# Altium PCB semubot_lidar_driver.PcbDoc (part 1 of 2)
Units mm, origin at the board's own origin, x right, y up, seen from the top; angles counter-clockwise.
Board outline 115 x 110 mm, 4 copper layers (Top Layer, Inner 1, Inner 2, Bottom Layer), stack 1.564 mm thick; 114 components, 69 nets, 444 pads, 478 vias.
Unrouted connection lines stored in the file: 2.
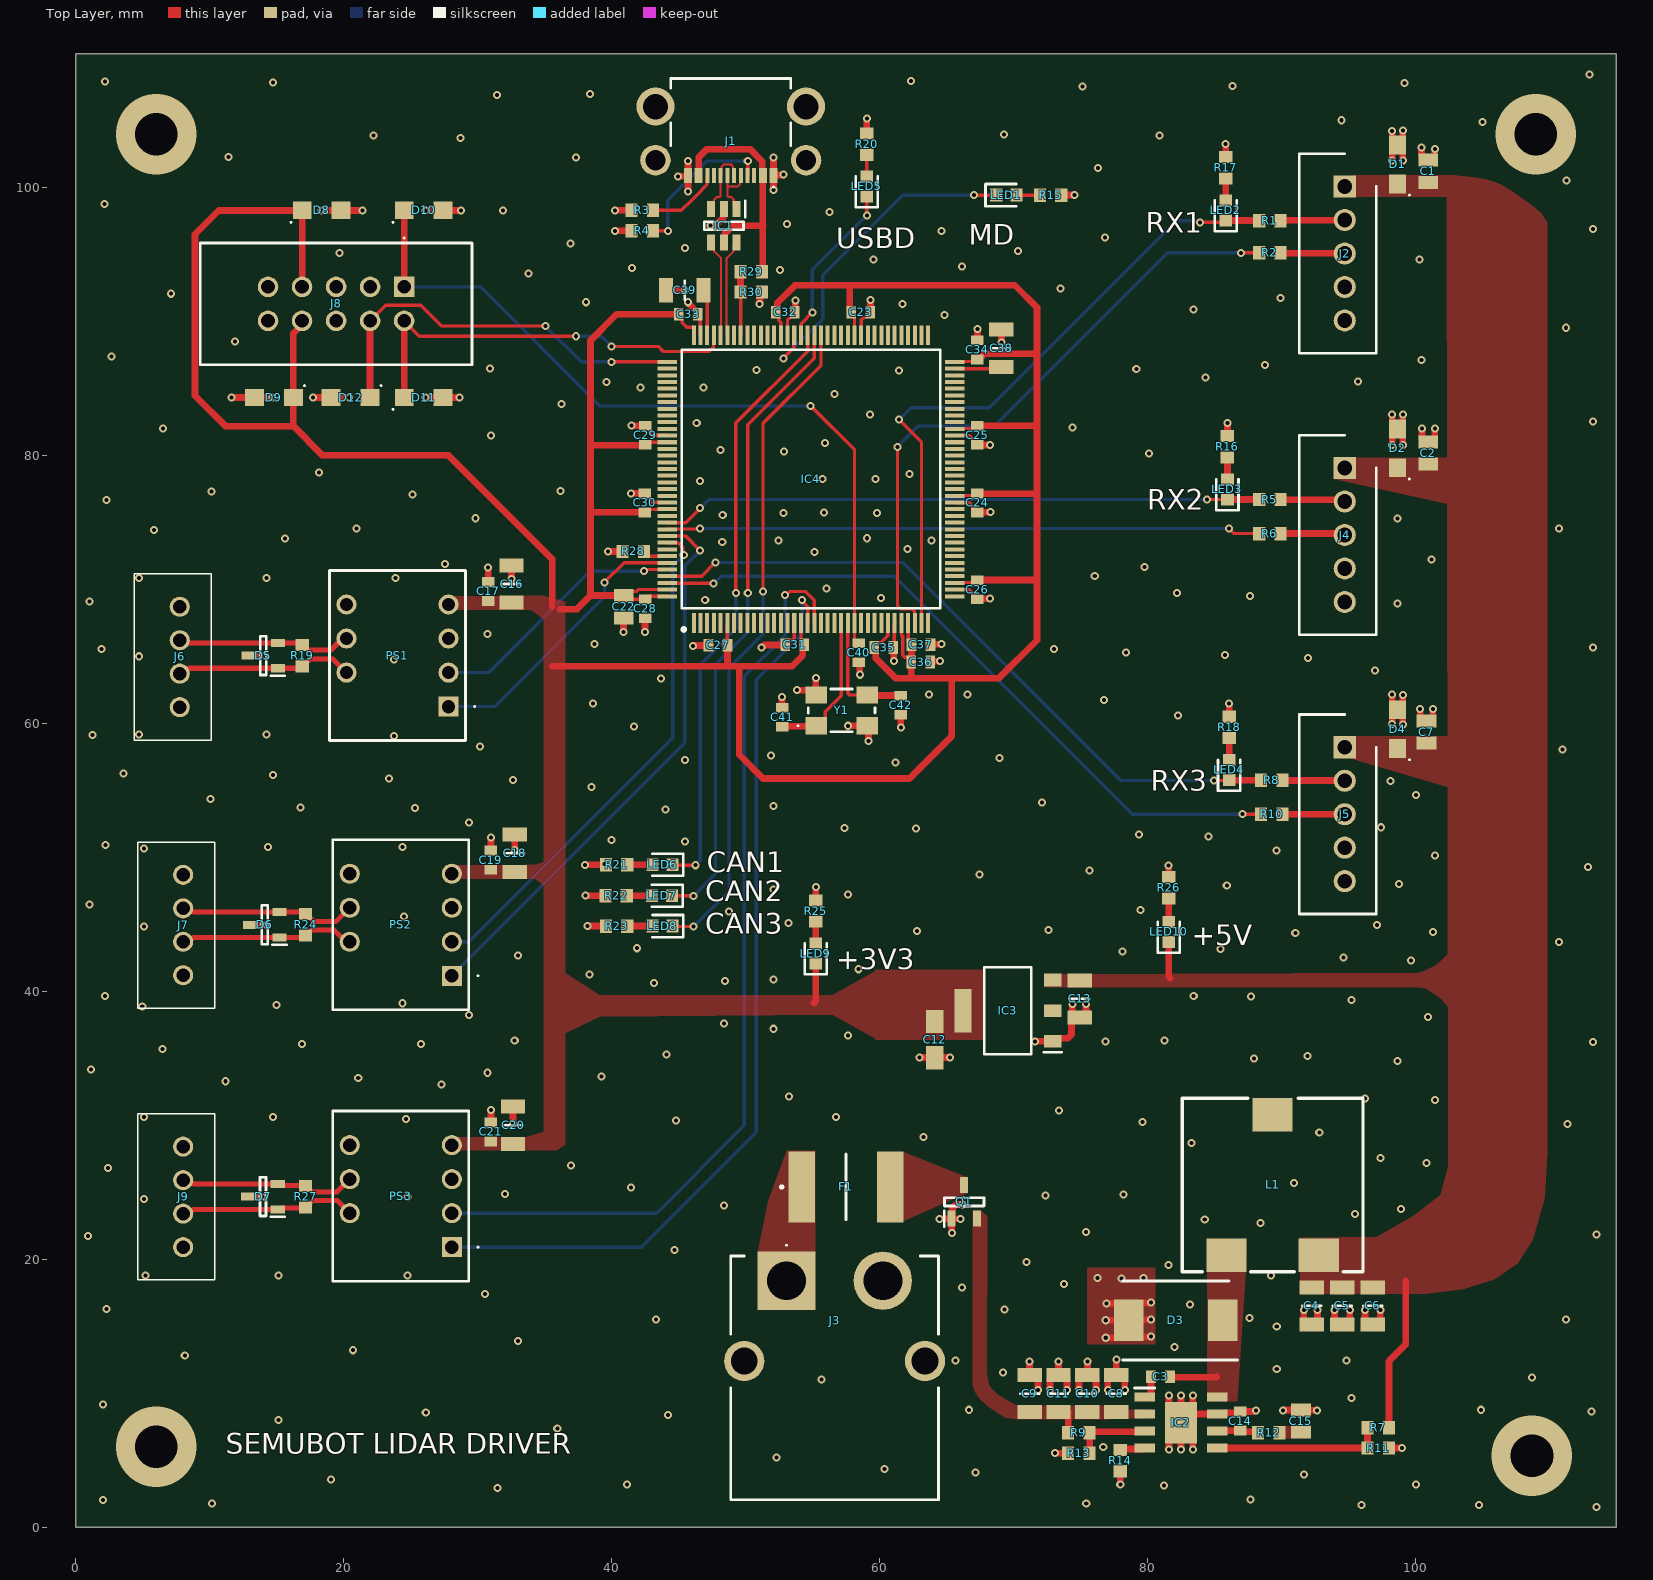
[diagram p0: Top Layer view]
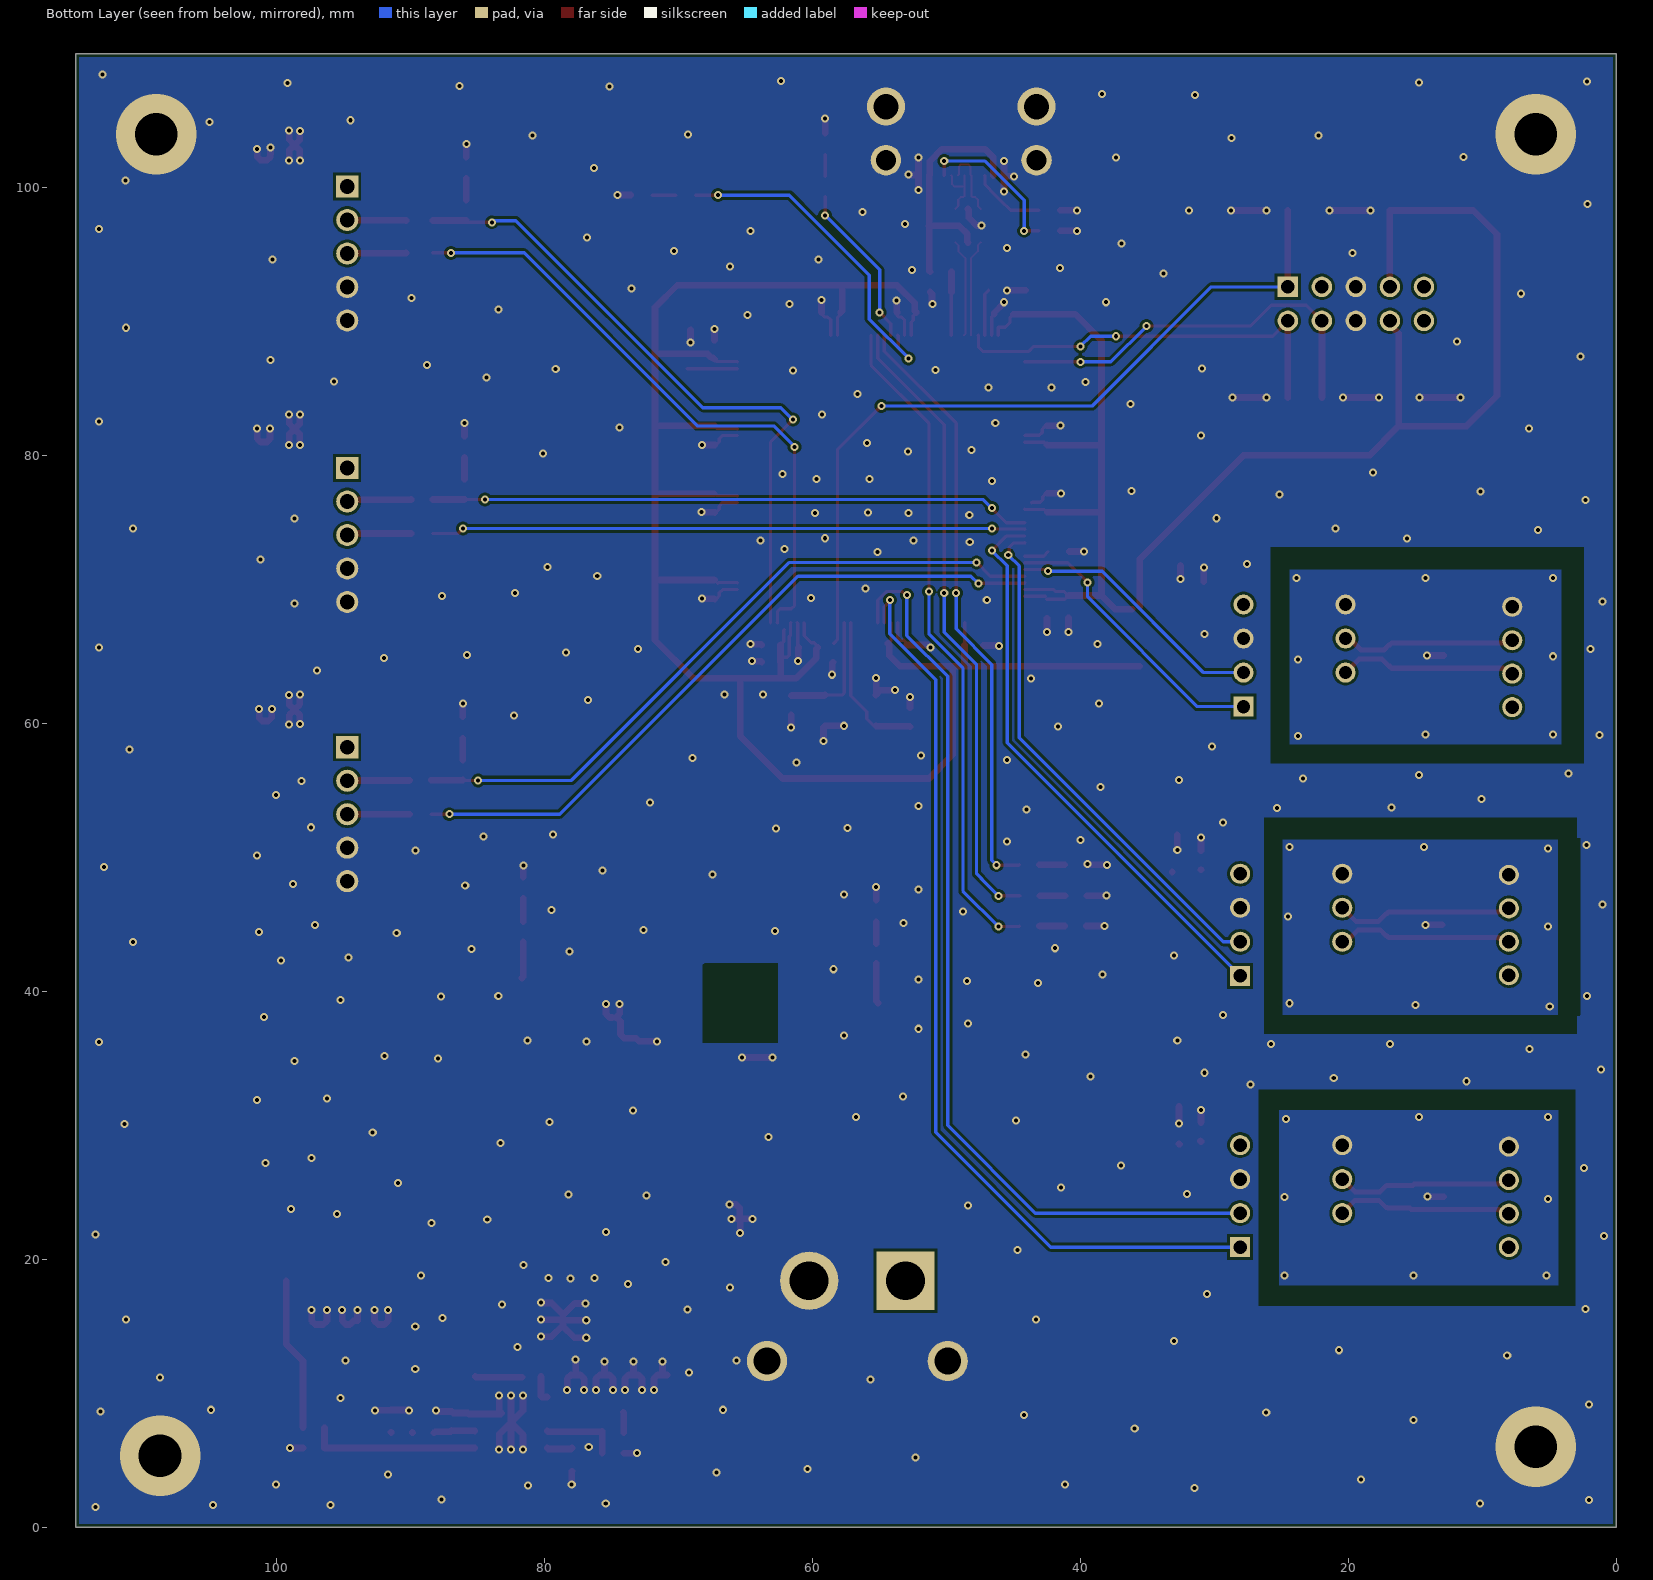
[diagram p1: Bottom Layer view, seen from below]
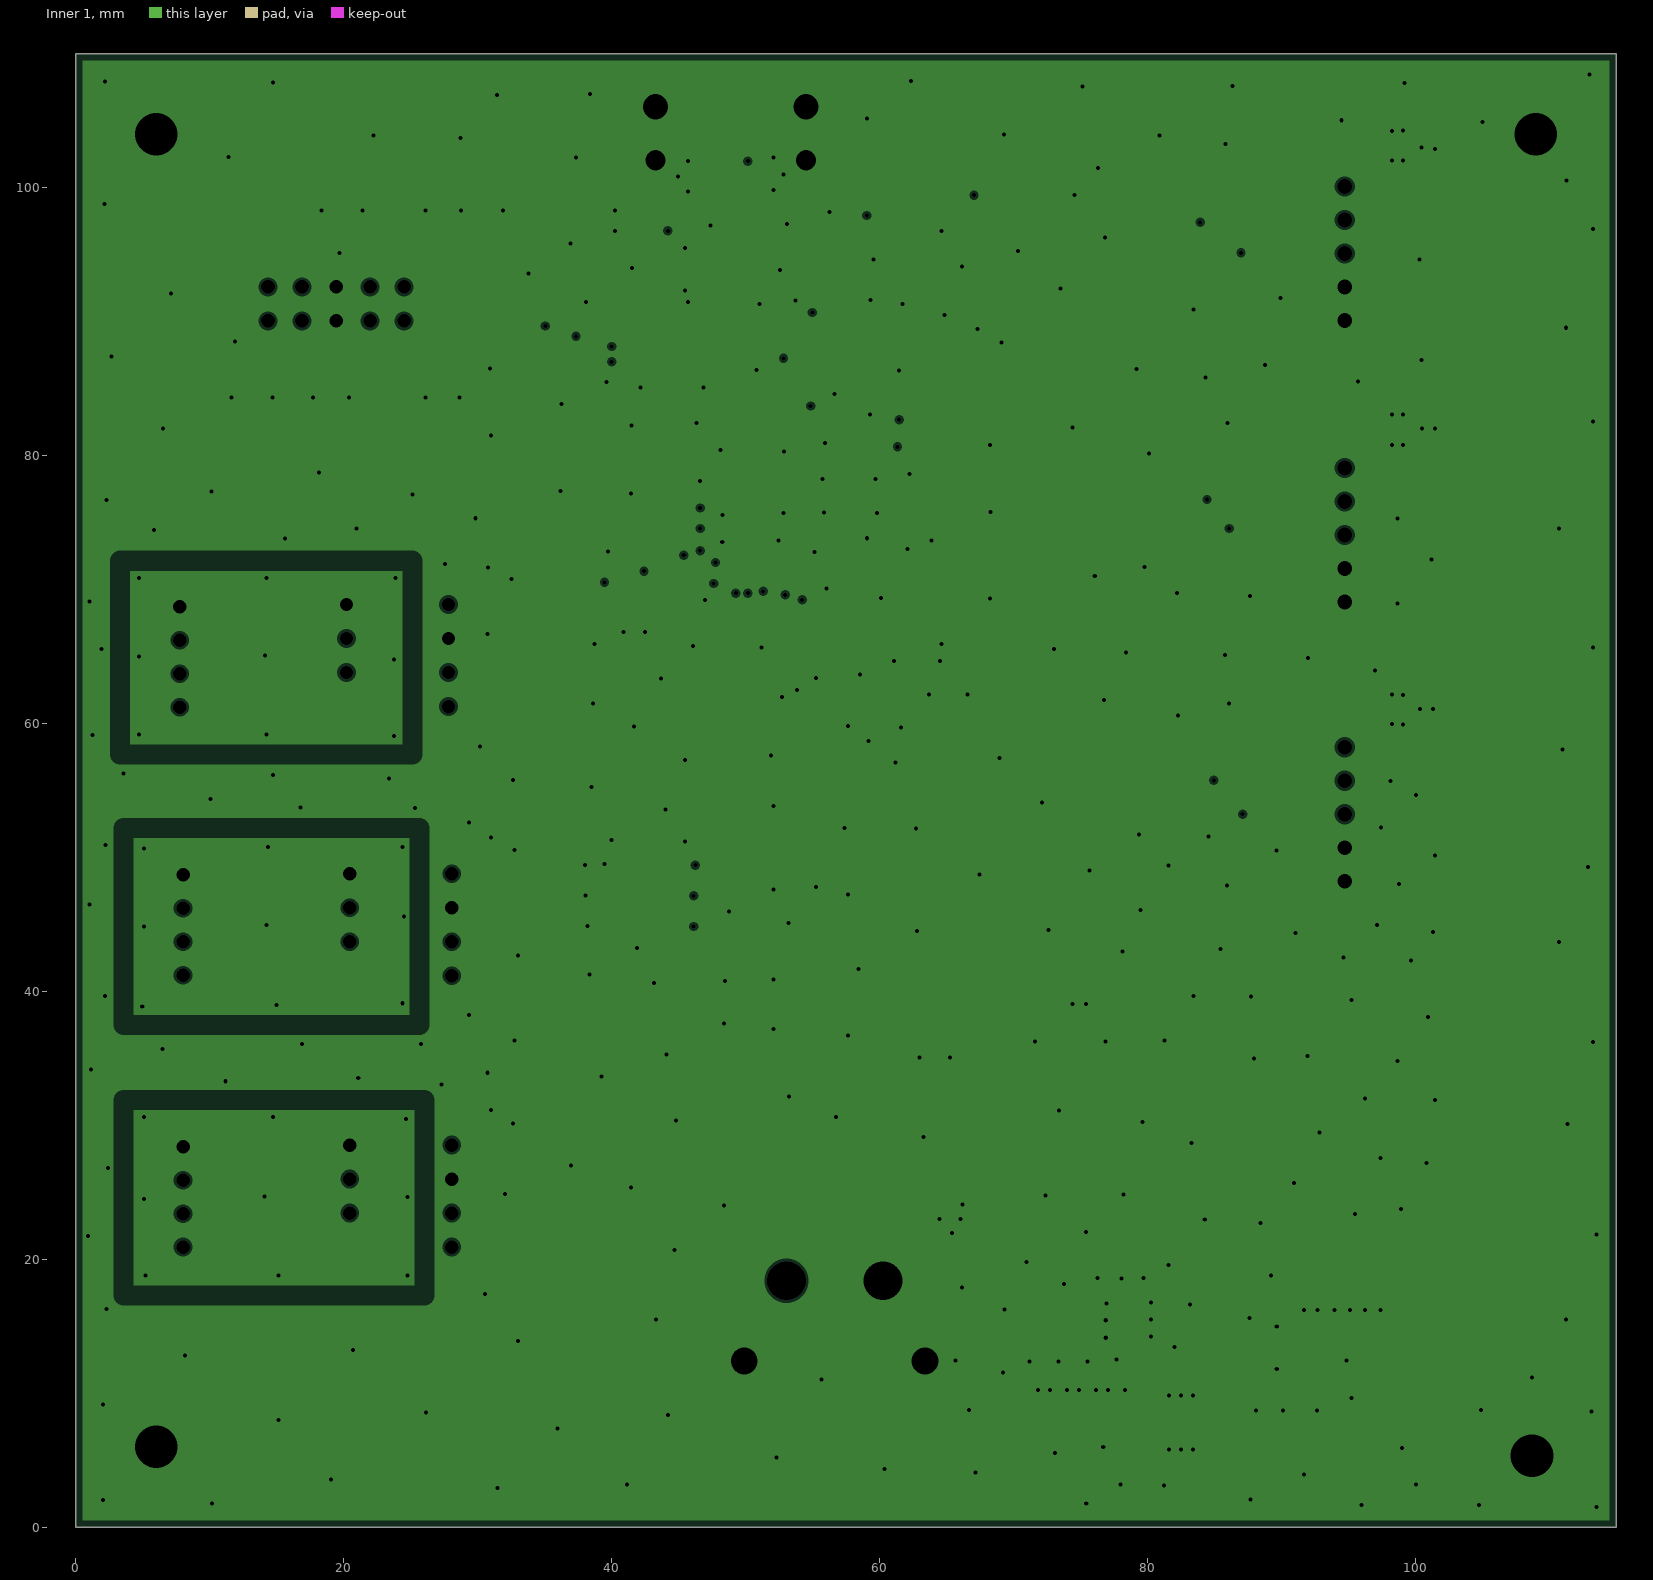
[diagram p2: Inner 1, clearances drawn from the general rule]
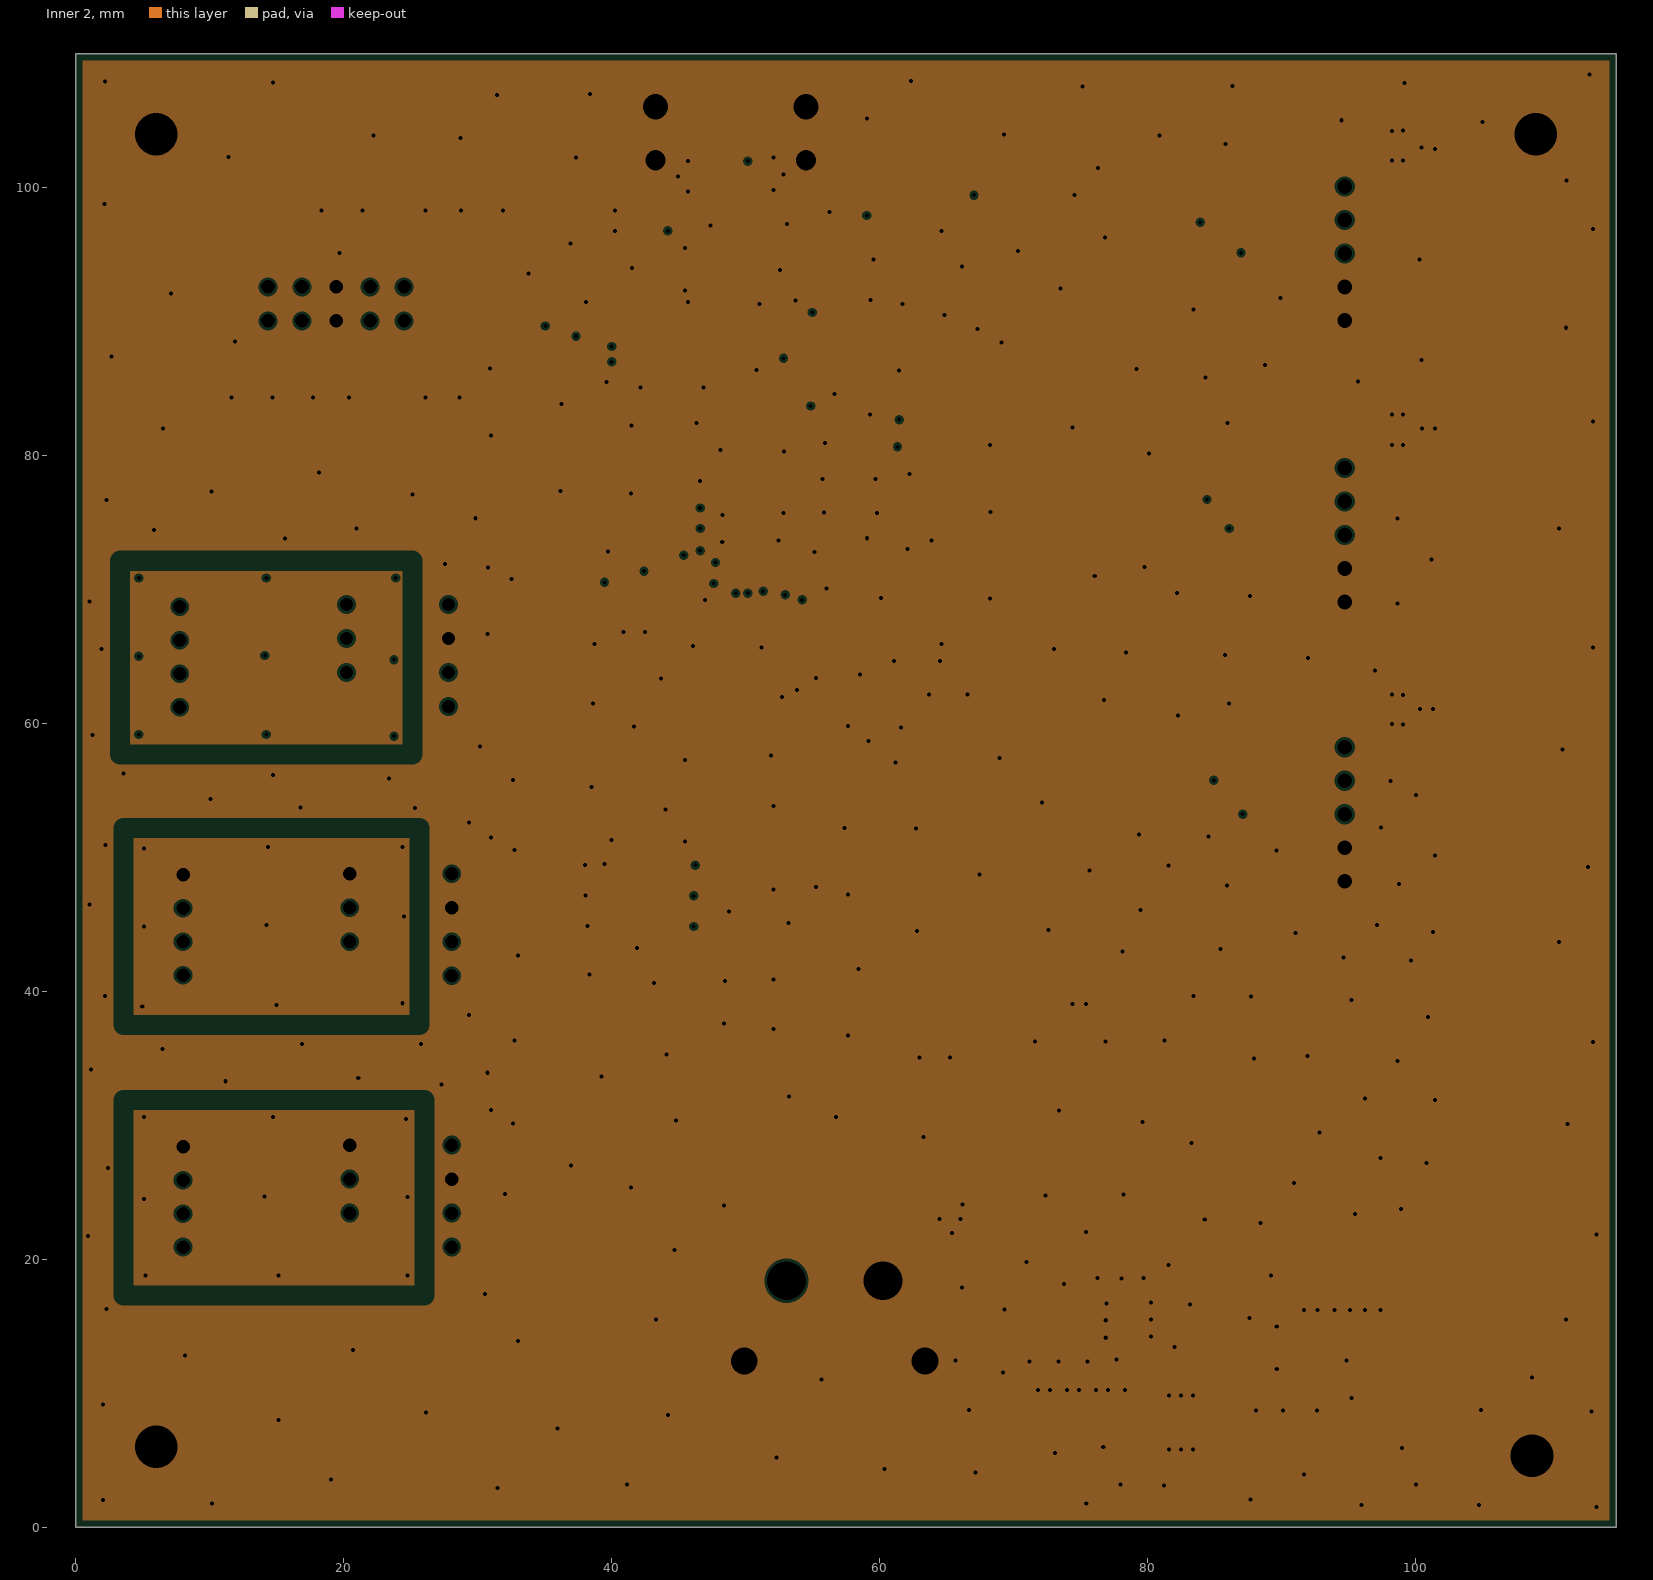
[diagram p3: Inner 2, clearances drawn from the general rule]
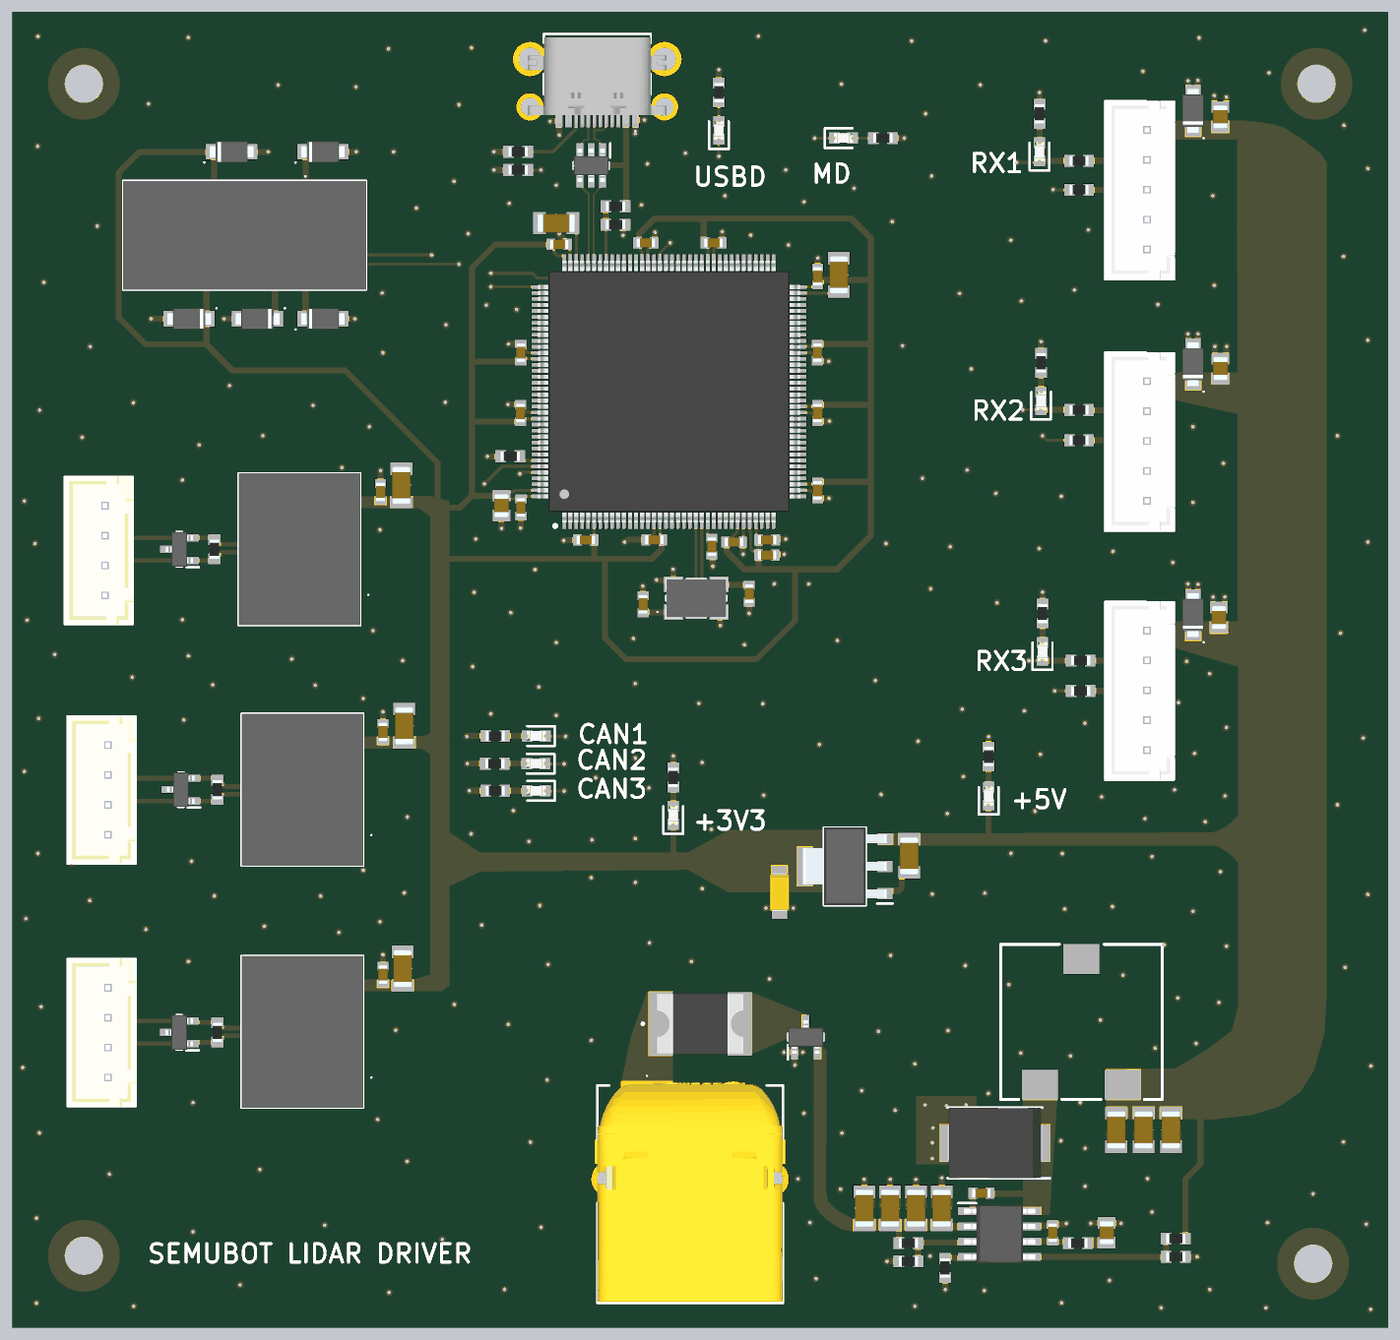
[diagram p5: 3D render of the assembled board from above, using the file's embedded part models]

## Layer stack, top to bottom
Top Solder: solder mask 0.0305, Solder Resist, Dk 3.8
Top Layer: signal copper 0.035
Dielectric 2: prepreg 0.0994, PP-006, Dk 4.1
Inner 1: plane copper 0.0152, net (Multiple Nets)
Dielectric 1: core 1.265, FR-4, Dk 4.43
Inner 2: plane copper 0.0152, net (Multiple Nets)
Dielectric 3: prepreg 0.0994, PP-006, Dk 4.1
Bottom Layer: signal copper 0.035
Bottom Solder: solder mask 0.0305, Solder Resist, Dk 3.8

## Board outline
0,0 0,110 115,110 115,0

## Design rules (kind name [scope] priority, off if disabled: settings)
AcuteAngle [All] p1: minimum=6.00000000000000E+0001 checktracksonly=FALSE
BoardOutlineClearance [All] p1: gap=0.25 ignorepadtopadclearanceinfootprint=FALSE
Clearance [All] p1: gap=0.2 ignorepadtopadclearanceinfootprint=FALSE except(0.28: Track-THPad)
DiffPairsRouting CAN1 [InNet('CANH1') OR InNet('CANL1')] p1: maxlimit=0.254 minlimit=0.254 mostfreqgap=0.254 toplayer_minwidth=0.381 toplayer_maxwidth=0.381 toplayer_prefwidth=0.381 bottomlayer_minwidth=0.381 bottomlayer_maxwidth=0.381 bottomlayer_prefwidth=0.381 maxuncoupledlength=12.7
DiffPairsRouting DiffPairsRoutingDIFF_90 [InDifferentialPair('USB_D') Or InDifferentialPair('USB')] p2: maxlimit=0.2 minlimit=0.2 mostfreqgap=0.2 toplayer_minwidth=0.155 toplayer_maxwidth=0.155 toplayer_prefwidth=0.155 bottomlayer_minwidth=0.155 bottomlayer_maxwidth=0.155 bottomlayer_prefwidth=0.155 impedanceprofiledriven=TRUE impedanceprofileid={C4F6CC11-D19B-4D07-BB28-ABDF192AAFE7} impedanceprofilevalue=90.000000 maxuncoupledlength=12.7
DiffPairsRouting [All] p3: maxlimit=0.254 minlimit=0.254 mostfreqgap=0.254 toplayer_minwidth=0.381 toplayer_maxwidth=0.381 toplayer_prefwidth=0.381 bottomlayer_minwidth=0.381 bottomlayer_maxwidth=0.381 bottomlayer_prefwidth=0.381 maxuncoupledlength=12.7
HoleSize [All] p1: absolutevalues=TRUE maxlimit=6.3 minlimit=0.2 maxpercent=80.000 minpercent=20.000
HoleToHoleClearance [All] p1: gap=0.5 allowstackedmicrovias=TRUE
MinimumSolderMaskSliver [All] p1: minsoldermaskwidth=0.1
PlaneClearance [All] p1: clearance=0.2
PlaneConnect PlaneConnect_Vias [IsVia] p1: planeconnectstyle=Direct reliefexpansion=0.508 reliefentries=4 reliefconductorwidth=0.305 reliefairgap=0.254
PlaneConnect [All] p2: planeconnectstyle=Relief reliefexpansion=0.508 reliefentries=4 reliefconductorwidth=0.305 reliefairgap=0.254
PolygonConnect PolygonConnect_Default [All] p1: connectstyle=Direct reliefconductorwidth=0.254 reliefentries=4 polygonreliefangle="90 Angle" airgapwidth=0.254
PolygonConnect [All] p2: connectstyle=Relief reliefconductorwidth=0.254 reliefentries=4 polygonreliefangle="90 Angle" airgapwidth=0.254
PolygonConnect PolygonConnect_1 [All] p3: connectstyle=Relief reliefconductorwidth=0.254 reliefentries=4 polygonreliefangle="90 Angle" airgapwidth=0.254
RoutingVias [All] p1: holewidth=0.3 width=0.6 viastyle="Through Hole" minholewidth=0.2 minwidth=0.45 maxholewidth=0.5 maxwidth=1
SilkToSolderMaskClearance [IsPad] p1: minsilkscreentomaskgap=0.15 clearancetoexposedcopper=TRUE
SolderMaskExpansion SolderMaskExpansion_via [IsVia] p1: expansion=0.102 istentingtop=TRUE
SolderMaskExpansion [All] p2: expansion=0.05 istentingtop=FALSE
SupplyNets "Schematic Supply Nets_9" [InNet('CANG2')] p1: voltage=0.000
SupplyNets "Schematic Supply Nets_5" [InNet('+3V3')] p2: voltage=0.000
SupplyNets "Schematic Supply Nets_4" [InNet('+5V')] p3: voltage=0.000
SupplyNets "Schematic Supply Nets_3" [InNet('+12V')] p4: voltage=0.000
SupplyNets "Schematic Supply Nets_2" [InNet('CANG1')] p5: voltage=0.000
SupplyNets "Schematic Supply Nets_1" [InNet('CANG3')] p6: voltage=0.000
SupplyNets "Schematic Supply Nets_8" [InNet('+5USB')] p7: voltage=0.000
SupplyNets "Schematic Supply Nets" [InNet('GND')] p8: voltage=0.000
Width Width_Power_12V_5V [InNet('+12V') Or InNet('+5V')] p1: maxlimit=5.08 minlimit=0.508 preferedwidth=1.524 // 5 A path: prefer polygon pours
Width Powerwidth [InNetClass('Power')] p2: maxlimit=1.5 minlimit=0.5 preferedwidth=1 minimp=50.000000 maximp=50.000000 favimp=50.000000
Width [All] p3: maxlimit=0.5 minlimit=0.15 preferedwidth=0.25 minimp=50.000000 maximp=50.000000 favimp=50.000000
23 further rules are at their usual default settings.

## Classes and differential pairs
component class U_microcontroller: C22 C23 C24 C25 C26 C27 C28 C29 C30 C31 C32 C33 C34 C35 C36 C37 C38 C39 C40 C41 C42 IC4 R28 R29 R30 Y1
differential pair class DIFF_90: USB_D
component class semubot_lidar_driver: 2 C2 C3 C4 C5 C6 C7 C8 C9 C10 C11 C12 C13 C14 C15 C16 C17 C18 C19 C20 C21 D1 D2 D3 D4 D5 D6 D7 D8 D9 D10 D11 D12 F1 IC1 IC2 IC3 J1 J2 J3 J4 J5 J6 J8 J9 L1 LED1 LED2 LED3 LED4 LED5 LED6 LED7 LED8 LED9 LED10 PS1 PS2 PS3 Q1 R1 R2 R3 R4 R5 R6 R7 R8 R9 R10 R11 R12 R13 R14 R15 R16 R17 R18 R19 R20 R21 R22 R23 R24 R25 R26 R27
differential pair USB_D: +USB_D_P -USB_D_N

## Components (designator, comment, footprint, x,y, rotation, side; value= is the part's Value field where it differs from the comment)
C1 "22uF" 0805Capacitor 100.965,101.237 r270 top
C2 "22uF" 0805Capacitor 100.975,80.193 r270 top
C3 "100nF" 0603Capacitor 80.986,11.24 r180 top
C4 "47uF" 1206CAPACITOR 92.262,16.518 r90 top
C5 "47uF" 1206CAPACITOR 94.548,16.518 r90 top
C6 "47uF" 1206CAPACITOR 96.834,16.518 r90 top
C7 "22uF" 0805Capacitor 100.848,59.367 r270 top
C8 "2.2uF" 1206CAPACITOR 77.684,9.97 r270 top
C9 "2.2uF" 1206CAPACITOR 71.207,9.97 r270 top
C10 "2.2uF" 1206CAPACITOR 75.525,9.97 r270 top
C11 "2.2uF" 1206CAPACITOR 73.366,9.97 r270 top
C12 "22uF Tantalum cap" CAPPM3216X180N 64.123,36.403 r270 top
C13 "10uF" 1206CAPACITOR 74.958,39.44 r90 top
C14 "47pF" 0603Capacitor 86.951,7.921 r270 top
C15 "4.7nF" 0805Capacitor 91.469,7.921 r270 top
C16 "10uF" 1206CAPACITOR 32.526,70.418 r270 top
C17 "100nF" 0603Capacitor 30.785,69.868 r270 top
C18 "10uF" 1206CAPACITOR 32.766,50.31 r270 top
C19 "100nF" 0603Capacitor 30.988,49.802 r270 top
C20 "10uF" 1206CAPACITOR 32.639,30.011 r270 top
C21 "100nF" 0603Capacitor 30.988,29.503 r270 top
C22 "4.7uF" 0805Capacitor 40.894,68.725 r90 top
C23 "100nF" 0603Capacitor 58.607,90.696 r180 top
C24 "100nF" 0603Capacitor 67.31,76.472 r90 top
C25 "100nF" 0603Capacitor 67.305,81.519 r90 top
C26 "100nF" 0603Capacitor 67.31,69.995 r90 top
C27 "100nF" 0603Capacitor 47.938,65.847 r0 top
C28 "100nF" 0603Capacitor 42.512,68.579 r90 top
C29 "100nF" 0603Capacitor 42.512,81.519 r270 top
C30 "100nF" 0603Capacitor 42.475,76.477 r270 top
C31 "100nF" 0603Capacitor 53.666,65.872 r0 top
C32 "100nF" 0603Capacitor 52.959,90.696 r180 top
C33 "100nF" 0603Capacitor 45.72,90.569 r180 top
C34 "100nF" 0603Capacitor 67.31,87.902 r270 top
C35 "100nF" 0603Capacitor 60.325,65.677 r180 top
C36 "100nF" 0603Capacitor 63.089,64.595 r180 top
C37 "100nF" 0603Capacitor 63.099,65.872 r180 top
C38 "2.2uF" 1206CAPACITOR 69.088,88.022 r270 top
C39 "2.2uF" 1206CAPACITOR 45.466,92.347 r0 top
C40 "100nF" 0603Capacitor 58.466,65.292 r90 top
C41 "12pF" 0603Capacitor 52.727,60.474 r270 top
C42 "12pF" 0603Capacitor 61.595,61.359 r90 top
D1 "SMF5.0A" SMF5.0A 98.679,101.745 r270 top
D2 "SMF5.0A" SMF5.0A 98.679,80.544 r270 top
D3 "B540CQ-13-F" B540CQ-13-F 82.129,15.431 r180 top
D4 "SMF5.0A" SMF5.0A 98.679,59.581 r270 top
D5 "PESD1CAN" SOT95P230X110-3N 13.979,65.079 r180 top
D6 "PESD1CAN" SOT95P230X110-3N 14.097,44.976 r180 top
D7 "PESD1CAN" SOT95P230X110-3N 13.97,24.677 r180 top
D8 "SMF3.3" SMF3.3 18.345,98.312 r180 top
D9 "SMF3.3" SMF3.3 14.789,84.342 r0 top
D10 "SMF3.3" SMF3.3 25.965,98.312 r180 top
D11 "SMF3.3" SMF3.3 25.965,84.342 r180 top
D12 "SMF3.3" SMF3.3 20.504,84.342 r0 top
F1 "2920L400_15MR" 2920L07560MR 57.5,25.399 r0 top
IC1 "USBLC6-2SC6" USBLC6-2SC6 48.387,97.173 r270 top
IC2 "TPS54560DDAR" TPS54560DDAR 82.51,7.811 r0 top
IC3 "AMS1117-3.3" AMS1117-3.3 69.584,38.562 r180 top
IC4 "STM32H723ZET6" STM32H723ZET6 54.886,78.254 r90 top
J1 "2169900002" 2169900002 48.895,104.92 r180 top
J2 "B5B-XH-A_LF_SN" B5B-XH-A(LF)(SN) 94.742,100.094 r90 top
J3 "XT60PW-M" XT60PW-M 53.05,18.399 r0 top
J4 "B5B-XH-A_LF_SN" B5B-XH-A(LF)(SN) 94.742,79.077 r90 top
J5 "B5B-XH-A_LF_SN" B5B-XH-A(LF)(SN) 94.742,58.231 r90 top
J6 "B4B-XH-A_LF__SN_" B4BXHALFSN 7.756,61.222 r90 top
J7 "B4B-XH-A_LF__SN_" B4BXHALFSN 8.001,41.206 r90 top
J8 "DS1013-10SSIB1" DS101310SSIB1 24.507,92.605 r180 top
J9 "B4B-XH-A_LF__SN_" B4BXHALFSN 8.001,20.908 r90 top
L1 "XRCEP125-7R2M" XRCEP125-7R2M 89.4,25.599 r0 top
LED1 "KT-0603R" LEDC1608X70N 69.469,99.459 r0 top
LED2 "KT-0603R" LEDC1608X70N 85.852,98.316 r90 top (schematic designator LED3)
LED3 "KT-0603R" LEDC1608X70N 85.979,77.488 r90 top (schematic designator LED2)
LED4 "KT-0603R" LEDC1608X70N 86.106,56.533 r90 top
LED5 "KT-0603R" LEDC1608X70N 59.055,100.106 r90 top
LED6 "KT-0603R" LEDC1608X70N 43.796,49.462 r180 top
LED7 "KT-0603R" LEDC1608X70N 43.759,47.148 r180 top
LED8 "KT-0603R" LEDC1608X70N 43.796,44.88 r180 top
LED9 "KT-0603R" LEDC1608X70N 55.245,42.829 r90 top
LED10 "KT-0603R" LEDC1608X70N 81.597,44.442 r90 top
PS1 "TD301MCANFD" TD301MCANFD 27.822,61.269 r90 top
PS2 "TD301MCANFD" TD301MCANFD 28.067,41.166 r90 top
PS3 "TD301MCANFD" TD301MCANFD 28.067,20.908 r90 top
Q1 "AO3407A" SOT95P280X125-3N 66.324,24.283 r90 top
R1 "100" 0603Resistor 89.154,97.554 r0 top
R2 "100" 0603Resistor 89.154,95.141 r0 top
R3 "5.1k" 0603Resistor 42.291,98.316 r0 top
R4 "5.1k" 0603Resistor 42.291,96.792 r0 top
R5 "100" 0603Resistor 89.154,76.726 r0 top
R6 "100" 0603Resistor 89.154,74.186 r0 top
R7 "54.9k" 0603Resistor 97.242,7.43 r0 top
R8 "100" 0603Resistor 89.281,55.771 r0 top
R9 "442k" 0603Resistor 74.89,7.049 r180 top
R10 "100" 0603Resistor 89.281,53.231 r0 top
R11 "10.2k" 0603Resistor 97.242,5.906 r180 top
R12 "16.9k" 0603Resistor 89.058,7.049 r180 top
R13 "90.9k" 0603Resistor 74.89,5.525 r0 top
R14 "243k" 0603Resistor 77.963,4.971 r90 top
R15 "1k" 0603Resistor 72.771,99.459 r0 top
R16 "1k" 0603Resistor 85.979,80.663 r90 top
R17 "1k" 0603Resistor 85.852,101.491 r90 top
R18 "1k" 0603Resistor 86.106,59.708 r90 top
R19 "120" 0603Resistor 16.9,65.079 r270 top
R20 "1k" 0603Resistor 59.055,103.269 r90 top
R21 "1k" 0603Resistor 40.367,49.462 r180 top
R22 "1k" 0603Resistor 40.33,47.148 r180 top
R23 "1k" 0603Resistor 40.367,44.88 r180 top
R24 "120" 0603Resistor 17.145,44.976 r270 top
R25 "1k" 0603Resistor 55.245,46.004 r90 top
R26 "1.5k" 0603Resistor 81.597,47.744 r90 top
R27 "120" 0603Resistor 17.145,24.677 r270 top
R28 "10k" 0603Resistor 41.62,72.847 r0 top
R29 "22k" 0603Resistor 50.419,93.744 r180 top
R30 "33k" 0603Resistor 50.419,92.22 r180 top
Y1 "XC53M4-8.000-F10NJDTD" XC53M48000F10NJDTD 57.172,60.982 r0 top

## Footprints (in the part's own frame and the unit in brackets; to place one, negate y for a bottom-side part, rotate by r counter-clockwise, add the part's x,y. Pads: shape width x height; smd on the part's side, far side on the other; paste and mask are expansions set on the pad)
0603Capacitor [mm]
  rect 0.73x0.94 smd: 1(-0.71,0) 2(0.71,0)
  body extent -0.8,-0.4 0.8,0.4, height 0.9
0603Resistor [mm]
  rect 0.9x1 smd: 1(-0.8,0) 2(0.8,0)
  body extent -0.8,-0.4 0.8,0.4, height 0.55
0805Capacitor [mm]
  rect 0.97x1.47 smd: 1(-0.83,0) 2(0.83,0)
  body extent -1,-0.63 1,0.63, height 1.45
1206CAPACITOR [mm]
  rect 1.05x1.82 smd: 1(-1.39,0) 2(1.39,0)
  silkscreen extent 0,-0.7 0,0.7, body extent -1.6,-0.8 1.6,0.8, height 1.8
2920L07560MR [mm]
  rect 2x5.3 smd: 1(-3.3,0) 2(3.3,0)
  silkscreen extent -4.9,-2.46 0,2.46, body extent -3.68,-2.56 3.68,2.56, height 1.19
2169900002 [mm]
  rect 0.6x1.1 smd: A1(-3.2,4) A4(-2.4,4) A9(2.4,4) A12(3.2,4)
  rect 0.3x1.1 smd: A5(-1.25,4) A6(-0.25,4) A7(0.25,4) A8(1.25,4) B5(1.75,4) B6(0.75,4) B7(-0.75,4) B8(-1.75,4)
  round 2.28 hole 1.52: MH1(-5.62,2.85) MH4(5.62,2.85)
  round 2.85 hole 1.9: MH2(-5.62,-1.15) MH3(5.62,-1.15)
  silkscreen extent -4.47,-3.25 4.47,4.9, body extent -5.77,-2.95 5.77,4.25, height 2.5
AMS1117-3.3 [mm] "C6186"
  rect 1.3x0.95 smd: 1(-3.35,2.29) 2(-3.35,0) 3(-3.35,-2.29)
  rect 1.3x3.25 smd: 4(3.35,0)
  silkscreen extent -4,-3.25 1.75,3.25, body extent -3.5,-3.25 3.5,3.25, height 1.8
B4BXHALFSN [mm]
  round 1.5 hole 1: 1(0,0) 2(2.5,0) 3(5,0) 4(7.5,0)
  silkscreen extent -2.45,-2.35 9.95,3.4, body extent -2.45,-2.35 9.95,3.4, height 7.52
B5B-XH-A(LF)(SN) [mm]
  rect 1.65x1.65 hole 1.1: 1(0,0)
  round 1.65 hole 1.1: 2(-2.5,0) 3(-5,0) 4(-7.5,0) 5(-10,0)
  silkscreen extent -12.45,-2.35 2.45,3.4, body extent -12.4,-2.45 2.5,3.3, height 7
B540CQ-13-F [mm]
  rect 2.2x3.1 smd: 1(-3.5,0) 2(3.5,0)
  silkscreen extent -4.6,-2.95 3.97,2.95, body extent -3.97,-2.95 3.97,2.95, height 2.5
CAPPM3216X180N [mm]
  rect 1.75x1.3 smd: 1(-1.35,0) 2(1.35,0)
  body extent -1.6,-0.8 1.6,0.8, height 1.8
DS101310SSIB1 [mm]
  rect 1.53x1.53 hole 1.02: 1(0,0)
  round 1.53 hole 1.02: 2(0,2.54) 3(2.54,0) 4(2.54,2.54) 5(5.08,0) 6(5.08,2.54) 7(7.62,0) 8(7.62,2.54) 9(10.16,0) 10(10.16,2.54)
  silkscreen extent -5.07,-3.7 15.23,5.82, body extent -5.07,-3.28 15.23,5.82, height 9.65
LEDC1608X70N [mm]
  rect 0.9x0.95 smd: 1(-0.75,0) 2(0.75,0)
  silkscreen extent -1.55,-0.82 0.75,0.82, body extent -0.8,-0.4 0.8,0.4, height 0.65
SMF3.3 [mm] "TVS DIODE 3V3"
  rect 1.4x1.3 smd: 1(-1.45,0) 2(1.45,0)
  silkscreen extent 2.24,0.84 2.34,0.94, body extent -1.83,-0.87 1.83,0.87, height 1.1
SMF5.0A [mm]
  rect 1.4x1.3 smd: 1(-1.45,0) 2(1.45,0)
  silkscreen extent 2.24,0.84 2.34,0.94, body extent -1.83,-0.87 1.83,0.87, height 1.1
SOT95P230X110-3N [mm]
  rect 1.05x0.6 smd: 1(-1.1,0.95) 2(-1.1,-0.95) 3(1.1,0)
  silkscreen extent -1.63,-1.45 0.23,1.5, body extent -1.15,-1.45 1.15,1.45, height 1.1
SOT95P280X125-3N [mm]
  rect 1.2x0.6 smd: 1(-1.25,0.95) 2(-1.25,-0.95) 3(1.25,0)
  silkscreen extent -1.85,-1.48 0.3,1.5, body extent -1.4,-1.48 1.4,1.48, height 1.25
STM32H723ZET6 [mm]
  rect 1.475x0.3 smd: 1(-10.738,8.75) 2(-10.738,8.25) 3(-10.738,7.75) 4(-10.738,7.25) 5(-10.738,6.75) 6(-10.738,6.25) 7(-10.738,5.75) 8(-10.738,5.25) 9(-10.738,4.75) 10(-10.738,4.25) 11(-10.738,3.75) 12(-10.738,3.25) 13(-10.738,2.75) 14(-10.738,2.25) 15(-10.738,1.75) 16(-10.738,1.25) 17(-10.738,0.75) 18(-10.738,0.25) 19(-10.738,-0.25) 20(-10.738,-0.75) 21(-10.738,-1.25) 22(-10.738,-1.75) 23(-10.738,-2.25) 24(-10.738,-2.75) 25(-10.738,-3.25) 26(-10.738,-3.75) 27(-10.738,-4.25) 28(-10.738,-4.75) 29(-10.738,-5.25) 30(-10.738,-5.75) 31(-10.738,-6.25) 32(-10.738,-6.75) 33(-10.738,-7.25) 34(-10.738,-7.75) 35(-10.738,-8.25) 36(-10.738,-8.75) 73(10.738,-8.75) 74(10.738,-8.25) 75(10.738,-7.75) 76(10.738,-7.25) 77(10.738,-6.75) 78(10.738,-6.25) 79(10.738,-5.75) 80(10.738,-5.25) 81(10.738,-4.75) 82(10.738,-4.25) 83(10.738,-3.75) 84(10.738,-3.25) 85(10.738,-2.75) 86(10.738,-2.25) 87(10.738,-1.75) 88(10.738,-1.25) 89(10.738,-0.75) 90(10.738,-0.25) 91(10.738,0.25) 92(10.738,0.75) 93(10.738,1.25) 94(10.738,1.75) 95(10.738,2.25) 96(10.738,2.75) 97(10.738,3.25) 98(10.738,3.75) 99(10.738,4.25) 100(10.738,4.75) 101(10.738,5.25) 102(10.738,5.75) 103(10.738,6.25) 104(10.738,6.75) 105(10.738,7.25) 106(10.738,7.75) 107(10.738,8.25) 108(10.738,8.75)
  rect 0.3x1.475 smd: 37(-8.75,-10.738) 38(-8.25,-10.738) 39(-7.75,-10.738) 40(-7.25,-10.738) 41(-6.75,-10.738) 42(-6.25,-10.738) 43(-5.75,-10.738) 44(-5.25,-10.738) 45(-4.75,-10.738) 46(-4.25,-10.738) 47(-3.75,-10.738) 48(-3.25,-10.738) 49(-2.75,-10.738) 50(-2.25,-10.738) 51(-1.75,-10.738) 52(-1.25,-10.738) 53(-0.75,-10.738) 54(-0.25,-10.738) 55(0.25,-10.738) 56(0.75,-10.738) 57(1.25,-10.738) 58(1.75,-10.738) 59(2.25,-10.738) 60(2.75,-10.738) 61(3.25,-10.738) 62(3.75,-10.738) 63(4.25,-10.738) 64(4.75,-10.738) 65(5.25,-10.738) 66(5.75,-10.738) 67(6.25,-10.738) 68(6.75,-10.738) 69(7.25,-10.738) 70(7.75,-10.738) 71(8.25,-10.738) 72(8.75,-10.738) 109(8.75,10.738) 110(8.25,10.738) 111(7.75,10.738) 112(7.25,10.738) 113(6.75,10.738) 114(6.25,10.738) 115(5.75,10.738) 116(5.25,10.738) 117(4.75,10.738) 118(4.25,10.738) 119(3.75,10.738) 120(3.25,10.738) 121(2.75,10.738) 122(2.25,10.738) 123(1.75,10.738) 124(1.25,10.738) 125(0.75,10.738) 126(0.25,10.738) 127(-0.25,10.738) 128(-0.75,10.738) 129(-1.25,10.738) 130(-1.75,10.738) 131(-2.25,10.738) 132(-2.75,10.738) 133(-3.25,10.738) 134(-3.75,10.738) 135(-4.25,10.738) 136(-4.75,10.738) 137(-5.25,10.738) 138(-5.75,10.738) 139(-6.25,10.738) 140(-6.75,10.738) 141(-7.25,10.738) 142(-7.75,10.738) 143(-8.25,10.738) 144(-8.75,10.738)
  silkscreen extent -11.35,-9.65 9.65,9.65, body extent -10.95,-10.95 10.95,10.95, height 1.6
TD301MCANFD [mm]
  rect 1.5x1.5 hole 1: 1(0,0)
  round 1.5 hole 1: 2(2.54,0) 3(5.08,0) 4(7.62,0) 5(7.62,7.62) 6(5.08,7.62) 7(2.54,7.62)
  silkscreen extent -2.54,-2 10.16,8.89, body extent -2.54,-1.27 10.16,8.89, height 8.55
TPS54560DDAR [mm]
  rect 1.525x0.65 smd: 1(-2.712,1.905) 2(-2.712,0.635) 3(-2.712,-0.635) 4(-2.712,-1.905) 5(2.712,-1.905) 6(2.712,-0.635) 7(2.712,0.635) 8(2.712,1.905)
  rect 2.4x3.1 smd: 9(0,0)
  silkscreen extent -3.47,2.58 -1.95,2.58, body extent -3,-2.45 3,2.45, height 1.57
USBLC6-2SC6 [mm]
  rect 1.2x0.6 smd: 1(-1.25,0.95) 2(-1.25,0) 3(-1.25,-0.95) 4(1.25,-0.95) 5(1.25,0) 6(1.25,0.95)
  silkscreen extent -1.85,-1.46 0.3,1.6, body extent -1.4,-1.46 1.4,1.46, height 1.45
XC53M48000F10NJDTD [mm]
  rect 1.6x1.3 smd: 1(-1.9,-1.15) 2(1.9,-1.15) 3(1.9,1.15) 4(-1.9,1.15)
  silkscreen extent -3.3,-1.6 2.5,1.6, body extent -2.57,-1.67 2.57,1.67, height 0.9
XRCEP125-7R2M [mm]
  rect 3x2.5 smd: 1(-3.498,-5.294) 2(3.402,-5.294) 3(-0.048,5.206)
  silkscreen extent -6.8,-6.53 6.7,6.44
XT60PW-M [mm]
  rect 4.35x4.35 hole 2.9: 1(0,0)
  round 4.35 hole 2.9: 2(7.2,0)
  round 3 hole 2: MH1(-3.15,-6) MH2(10.35,-6)
  silkscreen extent -4.15,-16.35 11.35,2.7, body extent -4.35,-16.23 11.55,2.05, height 8.45

## Part data
C1 C2 C3 C4 C5 C6 C7 C8 C9 C10 C11 C13 C14 C15 C16 C17 C18 C19 C20 C21 C22 C23 C24 C25 C26 C27 C28 C29 C30 C31 C32 C33 C34 C35 C36 C37 C38 C39 C40 C41 C42: library part Capacitor, "Capacitor"
  C1 C2 C7: Capacitance=22uF
  C3 C17 C19 C21 C23 C24 C25 C26 C27 C28 C29 C30 C31 C32 C33 C34 C35 C36 C37 C40: Capacitance=100nF
  C4 C5 C6: Capacitance=47uF
  C8 C9 C10 C11 C38 C39: Capacitance=2.2uF
  C13 C16 C18 C20: Capacitance=10uF
  C14: Capacitance=47pF
  C15: Capacitance=4.7nF
  C22: Capacitance=4.7uF
  C41 C42: Capacitance=12pF
C12: library part CA45-A010K226T, "Capacitor Polarised C122643 CA45-A010K226T", Manufacturer_Name="Hunan Xiangyee in S&T", Datasheet Link=https://datasheet.lcsc.com/szlcsc/1811261831_Hunan-Xiangyee-in-S-T-CA45-A010K226T_C122643.pdf, Height=1.8mm, Manufacturer_Part_Number=CA45-A010K226T
D1 D2 D4: "TVS diode", ComponentLink1Description=Datasheet, ComponentLink1URL=https://www.littelfuse.com/assetdocs/tvs-diodes-smf-datasheet?assetguid=7EB8A5B6-BDD0-4561-8F19-0C3CC6F9B2AF, Supplier 1=Mouser, Supplier Part Number 1=SMF5.0A
D3: "Schottky Diode", Manufacturer_Name="Diodes Incorporated", Mouser Part Number=621-B540CQ-13-F, Arrow Part Number=B540CQ-13-F, Arrow Price/Stock=https://www.arrow.com/en/products/b540cq-13-f/diodes-incorporated?utm_currency=USD&region=europe, Datasheet Link=https://www.diodes.com/assets/Datasheets/ds13012.pdf, Height=2.5mm, Manufacturer_Part_Number=B540CQ-13-F, Mouser Price/Stock=https://www.mouser.co.uk/ProductDetail/Diodes-Incorporated/B540CQ-13-F?qs=BvpHGKeVh3rbtYAYW%2FUwCw%3D%3D
D5 D6 D7: "TVS Diode (Bi-directional)", Manufacturer_Name=NXP, Mouser Part Number=N/A, Datasheet Link=https://datasheet.preprod.pas.partquest.com/images/VipMasterIC/IC/PHGL/PHGLS15341/PHGLS15341-1.pdf?hkey=61A2E4C270F0397D049F8F05BD4F1054, Height=1.1mm, Manufacturer_Part_Number=PESD1CAN, Mouser Price/Stock=https://www.mouser.co.uk/ProductDetail/NXP-Semiconductors/PESD1CAN?qs=55YtniHzbhBnD7lYYuVpRQ%3D%3D
D8 D9 D10 D11 D12: "TVS DIODE 3V3", ComponentLink1Description=Datasheet, ComponentLink1URL=https://www.littelfuse.com/assetdocs/tvs-diodes-smf3-3-datasheet?assetguid=2E80CD26-B0C3-442F-9D77-27A283CCFF4F
F1: "Resettable Fuse", Arrow Part Number=2920L400/15MR, Manufacturer_Name=LITTELFUSE, Mouser Part Number=576-2920L400/15MR, Arrow Price/Stock=https://www.arrow.com/en/products/2920l40015mr/littelfuse?utm_currency=USD&region=nac, Datasheet Link=http://m.littelfuse.com/~/media/electronics/datasheets/resettable_ptcs/littelfuse_ptc_2920l_datasheet.pdf.pdf, Height=1.8mm, Manufacturer_Part_Number=2920L400/15MR, Mouser Price/Stock=https://www.mouser.co.uk/ProductDetail/Littelfuse/2920L400-15MR?qs=%2FPOkb%252BiDxRVcBFTgv8H%2FIw%3D%3D
IC1: "Integrated Circuit", Manufacturer_Name=STMicroelectronics, Mouser Part Number=511-USBLC6-2SC6, Arrow Part Number=USBLC6-2SC6, Arrow Price/Stock=https://www.arrow.com/en/products/usblc6-2sc6/stmicroelectronics.html?utm_currency=USD&region=nac, Datasheet Link=https://www.st.com/resource/en/datasheet/usblc6-2.pdf, Height=1.45mm, Manufacturer_Part_Number=USBLC6-2SC6, Mouser Price/Stock=https://www.mouser.co.uk/ProductDetail/STMicroelectronics/USBLC6-2SC6?qs=po45yt2pPpu%2FhNIlwQdTlg%3D%3D
IC2: "Integrated Circuit", Manufacturer_Name="Texas Instruments", Mouser Part Number=595-TPS54560DDAR, Arrow Part Number=TPS54560DDAR, Arrow Price/Stock=https://www.arrow.com/en/products/tps54560ddar/texas-instruments?region=nac, Datasheet Link=http://www.ti.com/lit/ds/symlink/tps54560.pdf, Height=1.7mm, Manufacturer_Part_Number=TPS54560DDAR, Mouser Price/Stock=https://www.mouser.co.uk/ProductDetail/Texas-Instruments/TPS54560DDAR?qs=%2FA2SZCkL4Tlm1gC5t8ZNIg%3D%3D
IC3: "Integrated Circuit", Manufacturer_Name="Advanced Monolithic Systems", Manufacturer_Part_Number=AMS1117-1.5, Datasheet Link=http://www.advanced-monolithic.com/pdf/ds1117.pdf, Height=1.8mm
IC4: "Integrated Circuit", Manufacturer_Name=STMicroelectronics, Mouser Part Number=511-STM32H723ZET6, Arrow Part Number=STM32H723ZET6, Arrow Price/Stock=https://www.arrow.com/en/products/stm32h723zet6/stmicroelectronics?utm_currency=USD&region=nac, Datasheet Link=https://www.st.com/resource/en/datasheet/stm32h723zg.pdf, Height=1.6mm, Manufacturer_Part_Number=STM32H723ZET6, Mouser Price/Stock=https://www.mouser.co.uk/ProductDetail/STMicroelectronics/STM32H723ZET6?qs=sPbYRqrBIVnvdSB0MwAafg%3D%3D
J1: "Connector", Manufacturer_Name=Molex, Arrow Part Number=2169900002, Arrow Price/Stock=https://www.arrow.com/en/products/2169900002/molex.html?utm_currency=USD&region=nac, Datasheet Link=https://www.molex.com/en-us/products/part-detail-pdf/2169900002?display=pdf, Height=3.36mm, Manufacturer_Part_Number=2169900002
J2 J4 J5: "Connector", Arrow Part Number=B5B-XH-A(LF)(SN), Manufacturer_Name="JST (JAPAN SOLDERLESS TERMINALS)", Mouser Part Number=N/A, Arrow Price/Stock=https://www.arrow.com/en/products/b5b-xh-a-lf-sn/jst-manufacturing.html?utm_currency=USD&region=europe, Datasheet Link=http://www.jst-mfg.com/product/pdf/eng/eXH.pdf, Height=7mm, Manufacturer_Part_Number=B5B-XH-A(LF)(SN), Mouser Price/Stock=https://www.mouser.co.uk/ProductDetail/JST-Commercial/B5B-XH-ALFSN?qs=IKkN%2F947nfBtEhlRye3uAw%3D%3D
J3: "Connector: DC supply; socket; male; power supply; XT60; 30A; 500V", ComponentLink1Description=Datasheet, ComponentLink1URL=https://www.tme.eu/Document/b13629717d44ae038681dba08d18c0b6/XT60PW-M.pdf
J6 J7 J9: "Connector", Arrow Part Number=B4B-XH-A(LF)(SN), Manufacturer_Name="JST (JAPAN SOLDERLESS TERMINALS)", Mouser Part Number=306-B4BXHALFSN, Arrow Price/Stock=https://www.arrow.com/en/products/b4b-xh-a-lf-sn/jst-manufacturing.html?utm_currency=USD&region=europe, Datasheet Link=https://datasheet.lcsc.com/szlcsc/JST-Sales-America-B4B-XH-A-LF-SN_C144395.pdf, Height=7mm, Manufacturer_Part_Number=B4B-XH-A(LF)(SN), Mouser Price/Stock=https://www.mouser.co.uk/ProductDetail/JST-Commercial/B4B-XH-ALFSN?qs=cdbOS8ANM9CfC08d%252BywhFw%3D%3D
J8: "Connector", Manufacturer_Name=Connfly, Datasheet Link=https://www.tme.com/Document/27ec11f62a6bc702dcb7110a541f177d/DS1013.pdf, Height=9.55mm, Manufacturer_Part_Number=DS1013-10SSIB1
LED1 LED2 LED3 LED4 LED5 LED6 LED7 LED8 LED9 LED10: "LED", Manufacturer_Name="Hubei KENTO Elec", Datasheet Link=https://datasheet.lcsc.com/szlcsc/Hubei-KENTO-Elec-KT-0603R_C2286.pdf, Height=0.7mm, Manufacturer_Part_Number=KT-0603R
PS1 PS2 PS3: "Power Supply", Manufacturer_Name="Mornsun Power", Datasheet Link=https://www.mornsun-power.com/public/uploads/pdf/TD5(3)01MCANFD.pdf, Height=8.45mm, Manufacturer_Part_Number=TD301MCANFD
Q1: "MOSFET (P-Channel)", Arrow Part Number=AO3401A, Manufacturer_Name="Alpha & Omega Semiconductors", Arrow Price/Stock=https://www.arrow.com/en/products/ao3401a/alpha-and-omega-semiconductor.html?utm_currency=USD&region=nac, Height=1.25mm, Manufacturer_Part_Number=AO3407A
R1 R2 R3 R4 R5 R6 R7 R8 R9 R10 R11 R12 R13 R14 R15 R16 R17 R18 R19 R20 R21 R22 R23 R24 R25 R26 R27 R28 R29 R30: library part Resistor, "SMD Resistor"
  R1 R2 R5 R6 R8 R10: Resistance=100
  R3 R4: Resistance=5.1k
  R7: Resistance=54.9k
  R9: Resistance=442k
  R11: Resistance=10.2k
  R12: Resistance=16.9k
  R13: Resistance=90.9k
  R14: Resistance=243k
  R15 R16 R17 R18 R20 R21 R22 R23 R25: Resistance=1k
  R19 R24 R27: Resistance=120
  R26: Resistance=1.5k
  R28: Resistance=10k
  R29: Resistance=22k
  R30: Resistance=33k
Y1: "Crystal or Oscillator", Manufacturer_Name="Hang Crystal International", Datasheet Link=https://atlas.eefcdn.com/partdatasheet/666696/666696_94707471_1757293827116.pdf, Height=0.8mm, Manufacturer_Part_Number=XC53M4-8.000-F10NJDTD

## Via types
v1: diameter 0.6, hole 0.3, Top Layer to Bottom Layer, tented both sides, 474 vias
v2: diameter 6, hole 3.2, Top Layer to Bottom Layer, 4 vias

## Nets (pads, with @x,y where several pads share a name; then routed paths per layer and width w, separated by ;. In a path a pad name is that pad's centre, name@x,y a point inside that pad or via, vN(x,y) a via of type N, cw(c..) or ccw(c..) an arc to the next point about the centre after c; other vN are vias at no path point)
+3V3: C12.1 C16.2 C17.2 C18.2 C19.2 C20.2 C21.2 C22.2 C23.2 C24.2 C25.2 C26.2 C27.2 C28.2 C29.2 C30.2 C31.2 C32.2 C33.2 C34.2 C35.2 C36.2 C37.2 D8.2 D9.2 IC3.4 IC4.6 IC4.17 IC4.30 IC4.32 IC4.33 IC4.39 IC4.52 IC4.62 IC4.72 IC4.84 IC4.95 IC4.108 IC4.121 IC4.131 IC4.143 IC4.144 J8.7 J8.8 LED9.1 PS1.4 PS2.4 PS3.4 | length 279.5
  Top Layer w0.25: C30.2@42.475,75.767 42.686,75.979 44.123,75.979 IC4.131@44.148,76.004 ; C28.2@42.512,69.289 41.16,69.289 C22.2@40.894,69.555 41.198,69.859 41.84,69.859 41.984,70.004 IC4.143@44.148,70.004 ; C29.2@42.512,80.809 42.703,81.001 IC4.121@44.145,81.001 ; C28.2@42.607,69.5 IC4.144@44.144,69.5 ; C33.2@45.01,90.569 45.25,90.329 45.25,89.947 45.6,89.597 46.111,89.597 46.136,89.572 IC4.108@46.136,88.992 ; IC4.6@48.636,67.516 48.642,67.509 48.642,65.853 C27.2@48.648,65.847 ; C32.2@52.249,90.696 52.489,90.456 52.489,90.105 52.636,89.959 IC4.95@52.636,88.992 ; IC4.17@54.136,67.516 54.136,66.218 C31.2@54.376,65.977 ; C23.2@57.837,90.591 58.136,90.292 IC4.84@58.136,88.992 ; C35.2@59.615,65.782 59.855,66.022 60.085,66.022 60.611,66.547 60.611,67.491 IC4.30@60.636,67.516 ; IC4.32@61.636,67.516 61.641,67.51 61.641,66.603 61.725,66.519 61.725,65.086 61.871,64.94 62.139,64.94 C36.2@62.379,64.7 ; IC4.33@62.108,67.009 62.161,66.956 62.161,66.1 C37.2@62.389,65.872 ; IC4.39@65.624,70.504 65.649,70.529 67.024,70.529 C26.2@67.079,70.474 ; IC4.52@65.624,77.004 65.649,77.029 67.157,77.029 C24.2@67.31,77.182 ; IC4.62@65.624,82.004 65.649,82.029 67.104,82.029 C25.2@67.305,82.229 ; IC4.72@65.624,87.004 65.649,87.029 67.147,87.029 C34.2@67.31,87.192
  Top Layer w0.5: J8.8@16.887,90.065 16.887,89.786 16.239,89.138 D9.2@16.239,84.342 16.239,82.204 ; J8.7@16.887,92.605 16.891,92.609 D8.2@16.891,98.308 ; D8.2@16.895,98.312 10.664,98.312 8.89,96.538 8.89,84.473 11.159,82.204 16.239,82.204 ; PS3.4@28.067,28.528 PS3.4@28.073,28.533 ; PS2.4@28.067,48.786 PS2.4@28.081,48.8 ; C19.2@30.974,49.078 C19.2@30.988,49.092 C19.2@30.999,49.081 ; C21.2@30.983,28.787 C21.2@30.988,28.793 C21.2@31.029,28.834 ; C20.2@32.598,28.58 C20.2@32.639,28.621 ; C18.2@33.136,48.931 C18.2@33.147,48.92 ; 35.56,64.28 48.641,64.28 ; 35.56,68.725 35.56,72.281 27.813,80.028 18.415,80.028 16.239,82.204 ; 36.128,68.542 37.409,68.542 38.422,69.555 ; 38.481,75.71 38.538,75.767 C30.2@42.475,75.767 ; C22.2@40.894,69.555 38.422,69.555 ; C29.2@42.512,80.809 42.483,80.78 38.422,80.78 ; C33.2@45.01,90.569 40.386,90.569 38.422,88.605 38.422,80.78 ; C27.2@48.648,65.847 48.648,64.287 48.641,64.28 ; 49.53,64.153 49.53,57.676 51.308,55.898 62.23,55.898 65.405,59.073 65.405,63.391 ; C32.2@52.249,90.696 52.364,90.811 52.364,91.401 53.684,92.72 58.07,92.72 ; C31.2@54.376,65.977 54.27,65.871 54.27,65.083 53.821,64.634 53.467,64.28 48.641,64.28 ; 55.118,39.134 55.245,39.261 LED9.1@55.245,42.079 ; 57.785,92.601 57.785,90.808 C23.2@57.897,90.696 ; 58.078,92.728 70.104,92.728 71.755,91.077 71.755,87.592 ; C35.2@59.615,65.677 59.716,65.576 59.716,64.882 61.207,63.391 62.357,63.391 ; C37.2@62.389,65.872 62.384,65.867 62.384,64.6 C36.2@62.379,64.595 62.379,63.413 62.357,63.391 ; C25.2@67.305,82.229 71.713,82.229 71.755,82.187 ; C34.2@67.31,87.192 67.425,87.307 67.53,87.307 67.83,87.607 71.74,87.607 71.755,87.592 ; C26.2@67.319,70.714 71.671,70.714 71.755,70.63 ; C24.2@67.334,77.158 71.704,77.158 71.755,77.107 ; 38.422,69.555 38.422,80.78 ; 62.357,63.391 65.405,63.391 ; 65.405,63.391 68.922,63.391 71.755,66.224 71.755,70.63 ; 71.755,70.63 71.755,77.107 ; 71.755,77.107 71.755,82.187 ; 71.755,82.187 71.755,87.592
+5USB: IC1.5 J1.A4 J1.A9 R29.1 | length 18.8
  Top Layer w0.5: J1.A9@46.495,100.92 46.495,102.266 47.117,102.888 50.337,102.888 51.245,101.98 51.245,100.97 J1.A4@51.295,100.92 51.295,97.173 ; IC1.5@48.387,95.923 48.437,95.973 48.437,96.559 49.051,97.173 51.295,97.173 ; R29.1@51.219,93.744 51.295,93.82 51.295,97.173 ; 51.308,97.173 51.295,97.173
+5V: C1.2 C2.2 C4.2 C5.2 C6.2 C7.2 C13.2 D1.2 D2.2 D4.2 IC3.3 J2.1 J4.1 J5.1 L1.2 LED10.1 R7.2 | length 14.2
  Top Layer w0.508: LED10.1@81.597,43.692 81.597,41.102 81.7,40.999 ; R7.2@98.042,7.43 98.042,12.409 99.3,13.667 99.3,18.399
+12V: C8.2 C9.2 C10.2 C11.2 IC2.2 Q1.2 R9.2 | length 1.5
  Top Layer w0.508: R9.2@74.09,7.049 74.09,8.542 C11.2@74.128,8.58
CAN1: IC4.91 LED6.1 | length 44.8
  Top Layer w0.25: LED6.1@44.546,49.462 44.587,49.421 v1(46.251,49.421) ; v1(49.276,69.741) 49.276,82.441 54.636,87.801 IC4.91@54.636,88.992
  Bottom Layer w0.25: v1(46.251,49.421) 46.609,49.779 46.609,64.407 49.276,67.074 v1(49.276,69.741)
CAN2: IC4.90 LED7.1 | length 47.2
  Top Layer w0.25: LED7.1@44.509,47.148 44.521,47.135 v1(46.124,47.135) ; v1(50.165,69.741) 50.165,82.314 55.136,87.285 IC4.90@55.136,88.992
  Bottom Layer w0.25: v1(46.124,47.135) 47.394,48.405 ; 47.371,48.405 47.752,48.786 47.752,64.407 50.165,66.82 v1(50.165,69.741)
CAN3: IC4.89 LED8.1 | length 49.8
  Top Layer w0.25: LED8.1@44.546,44.88 44.577,44.849 v1(46.124,44.849) ; v1(51.308,69.868) 51.308,82.441 55.636,86.769 IC4.89@55.636,88.992
  Bottom Layer w0.25: v1@46.069,44.794 48.768,47.493 48.768,64.153 51.308,66.693 v1(51.308,69.868)
CANG1: D5.3 J6.4 PS1.5 | length 1.2
  Top Layer w0.5: D5.3@12.879,65.079 v1(14.106,65.079)
  other v1: 23.749,59.055 4.699,59.182 14.224,59.182 23.749,64.77 4.699,65.024 4.699,70.866 14.224,70.866 23.876,70.866
CANG2: D6.3 J7.4 PS2.5 | length 1.2
  Top Layer w0.5: D6.3@12.997,44.976 v1(14.224,44.976)
  other v1: 4.953,38.862 14.986,38.989 24.384,39.116 5.08,44.831 24.511,45.593 5.08,50.673 14.351,50.8 24.384,50.8
CANG3: D7.3 J9.4 PS3.5 | length 1.2
  Top Layer w0.5: D7.3@12.87,24.677 v1(14.097,24.677)
  other v1: 5.207,18.796 15.113,18.796 24.765,18.796 5.08,24.511 24.765,24.638 24.638,30.48 5.08,30.607 14.732,30.607
CANH1: D5.1 J6.2 PS1.7 R19.2 | length 13.3
  Top Layer w0.381: J6.2@7.756,63.722 8.059,63.722 8.466,64.129 D5.1@15.079,64.129 16.75,64.129 R19.2@16.9,64.279 16.95,64.279 17.496,64.825 19.186,64.825 PS1.7@20.202,63.809
CANH2: D6.1 J7.2 PS2.7 R24.2 | length 13.2
  Top Layer w0.381: J7.2@8.001,43.706 8.215,43.92 8.678,43.92 8.784,44.026 D6.1@15.197,44.026 16.995,44.026 R24.2@17.145,44.176 17.195,44.176 17.614,44.595 19.255,44.595 20.144,43.706 PS2.7@20.447,43.706
CANH3: D7.1 J9.2 PS3.7 R27.2 | length 13.3
  Top Layer w0.381: J9.2@8.001,23.408 8.215,23.622 8.679,23.622 8.784,23.727 15.295,23.727 15.405,23.836 17.055,23.836 17.095,23.877 17.195,23.877 17.719,24.4 19.495,24.4 PS3.7@20.447,23.448
CANL1: D5.2 J6.3 PS1.6 R19.1 | length 13.1
  Top Layer w0.381: J6.3@7.756,66.222 7.949,66.029 16.75,66.029 R19.1@16.9,65.879 16.95,65.879 17.331,65.498 19.048,65.498 19.899,66.349 PS1.6@20.202,66.349
CANL2: D6.2 J7.3 PS2.6 R24.1 | length 13.2
  Top Layer w0.381: J7.3@8.001,46.206 8.215,45.992 8.718,45.992 8.784,45.926 16.995,45.926 R24.1@17.145,45.776 ; R24.1@17.195,45.776 17.741,45.23 19.431,45.23 PS2.6@20.447,46.246
CANL3: D7.2 J9.3 PS3.6 R27.1 | length 13.2
  Top Layer w0.381: J9.3@8.001,25.908 8.215,25.694 8.717,25.694 8.784,25.627 D7.2@15.07,25.627 15.177,25.52 17.102,25.52 R27.1@17.145,25.477 17.195,25.477 17.637,25.035 19.495,25.035 PS3.6@20.447,25.988
FB: IC2.5 R7.1 R11.2 | length 12.7
  Top Layer w0.5: IC2.5@85.222,5.906 R11.2@96.442,5.906 R7.1@96.442,7.43
FDCAN_RX1: IC4.139 PS1.1 | length 21.4
  Top Layer w0.25: v1(39.466,70.542) 40.927,72.004 IC4.139@44.148,72.004
  Bottom Layer w0.25: PS1.1@27.822,61.269 31.279,61.269 39.466,69.456 v1(39.466,70.542)
FDCAN_RX2: IC4.135 PS2.1 | length 42.3
  Top Layer w0.25: IC4.135@44.148,74.004 45.521,74.004 v1(46.609,72.916)
  Bottom Layer w0.25: PS2.1@28.067,41.166 45.466,58.565 45.466,71.773 v1(46.609,72.916)
FDCAN_RX3: IC4.18 PS3.1 | length 69.3
  Top Layer w0.25: v1(54.229,69.233) 54.229,69.138 54.636,68.732 IC4.18@54.636,67.516
  Bottom Layer w0.25: PS3.1@28.067,20.908 42.226,20.908 50.8,29.482 50.8,63.264 54.229,66.693 v1(54.229,69.233)
FDCAN_TX1: IC4.140 PS1.2 | length 19.5
  Top Layer w0.25: v1(42.421,71.379) 42.516,71.379 42.641,71.504 IC4.140@44.148,71.504
  Bottom Layer w0.25: PS1.2@27.822,63.809 30.806,63.809 38.379,71.382 42.418,71.382 v1(42.421,71.379)
FDCAN_TX2: IC4.136 PS2.2 | length 38.7
  Top Layer w0.25: IC4.136@44.148,73.504 44.173,73.479 45.02,73.479 45.318,73.18 45.318,72.643 v1(45.385,72.576)
  Bottom Layer w0.25: PS2.2@28.067,43.706 29.337,43.706 44.577,58.946 44.577,71.768 v1(45.385,72.576)
FDCAN_TX3: IC4.19 PS3.2 | length 69.7
  Top Layer w0.25: v1(52.959,69.614) 53.054,69.614 53.298,69.858 54.488,69.858 55.136,69.21 IC4.19@55.136,67.516
  Bottom Layer w0.25: PS3.2@28.067,23.448 43.369,23.448 49.911,29.99 49.911,63.523 52.959,66.571 v1(52.959,69.614)